# Altium PCB PCB.PcbDoc (part 7 of 8)
Units mm, origin at the board's own origin, x right, y up, seen from the top; angles counter-clockwise.
Board outline 78.8 x 69 mm, 12 copper layers (Top Layer, GND_12, uStrip1, GND_35, Clocks, GND_57, POWER, Slow_Ctrl, GND_810, uStrip2, GND_1012, Bottom Layer), stack 2.926 mm thick; 460 components, 314 nets, 1929 pads, 3409 vias.
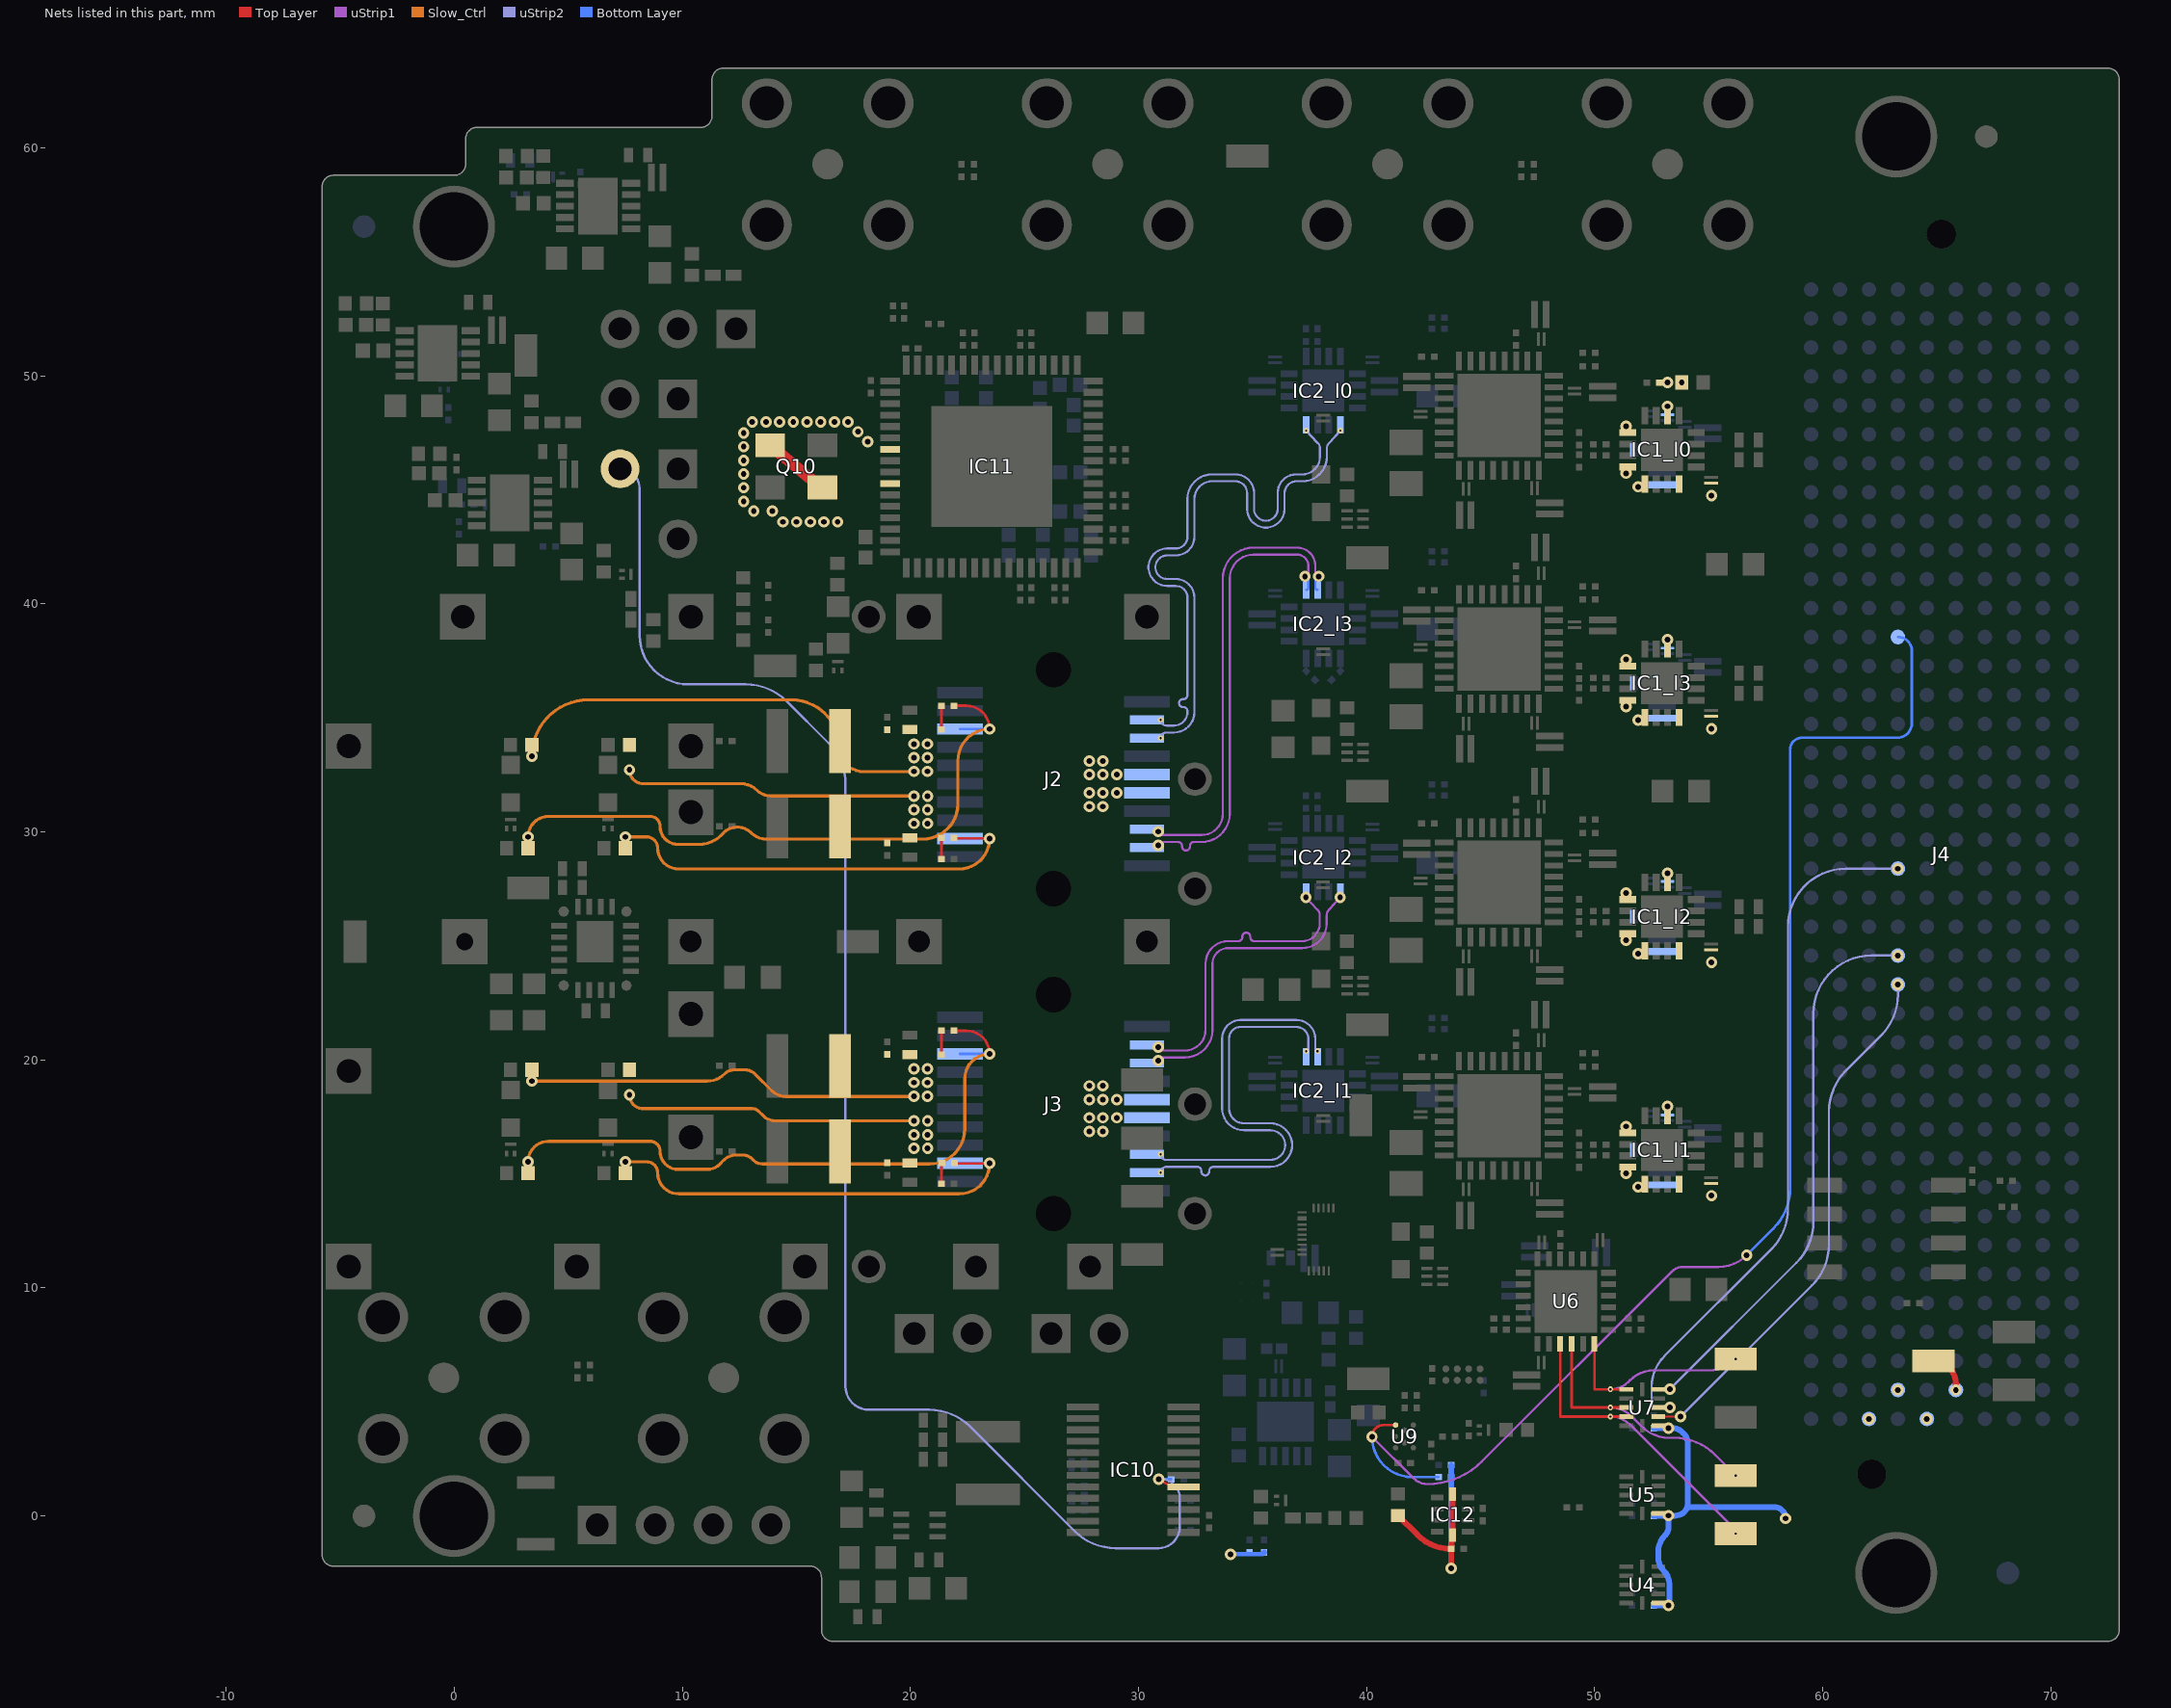
[diagram p16: the nets of this part, all layers, seen from the top]

## Via types
v1: diameter 0.25, hole 0.1, Top Layer to uStrip1, tented both sides, 1130 vias
v2: diameter 0.25, hole 0.1, uStrip2 to Bottom Layer, tented both sides, 686 vias
v3: diameter 0.5, hole 0.25, Top Layer to Bottom Layer, tented both sides, 674 vias
v4: diameter 0.5, hole 0.25, Top Layer to Bottom Layer, 632 vias
v5: diameter 0.5, hole 0.25, uStrip1 to uStrip2, tented both sides, 281 vias
v6: diameter 0.584, hole 0.483, Top Layer to Bottom Layer, tented both sides, 6 vias

## Nets (pads, with @x,y where several pads share a name; then routed paths per layer and width w, separated by ;. In a path a pad name is that pad's centre, name@x,y a point inside that pad or via, vN(x,y) a via of type N, cw(c..) or ccw(c..) an arc to the next point about the centre after c; other vN are vias at no path point) (continued)
SDA_PLL: IC10.17 R60.1 W6.2 | length 69.1
  Top Layer w0.117: v3(30.88,1.611) 31.324,1.369 IC10.17@31.978,1.277
  uStrip2 w0.102: W6.2@7.268,45.925 cw(c7.268,45.067) 8.126,45.067 8.126,38.612 ccw(c10.264,38.612) 10.264,36.475 12.782,36.475 cw(c12.782,33.935) 14.578,35.731 16.406,33.902 cw(c14.61,32.106) 17.15,32.106 17.15,5.69 ccw(c18.182,5.69) 18.182,4.658 20.826,4.658 cw(c20.826,2.118) 22.622,3.914 27.202,-0.666 ccw(c28.998,1.13) 28.998,-1.41 30.874,-1.41 ccw(c30.874,-0.472) 31.811,-0.472 31.811,0.787 ccw(c30.987,0.787) 30.987,1.611 v3(30.88,1.611)
  Bottom Layer w0.117: v3(30.88,1.611) R60.1@31.428,1.611
SDA_PSC: J4.G21 U7.3 | length 30.4
  uStrip2 w0.102: v3(53.298,4.757) 52.705,4.757 cw(c52.705,4.965) 52.498,4.965 52.498,5.661 cw(c54.415,5.659) 53.06,7.015 57.732,11.687 ccw(c55.936,13.483) 58.476,13.483 58.476,25.85 cw(c61.016,25.85) 61.016,28.39 v3(63.298,28.39)
SDA_PSC_3V3: TP16.1 U6.22 U7.9 | length 11.7
  Top Layer w0.117: U6.22@48.992,7.548 48.992,4.757 v1(50.69,4.757) U7.9@51.389,4.757
  uStrip1 w0.102: v1(50.69,4.757) cw(c50.69,3.455) 51.611,4.376 52.051,3.935 ccw(c53.271,5.155) 53.271,3.43 53.481,3.43 cw(c53.481,0.89) 55.277,2.686 v1(56.186,1.777)
SDA_PSF: J4.G13 R83.2 U9.5 | length 59.4
  Top Layer w0.117: v3(40.236,3.477) cw(c40.748,3.477) 40.748,3.99 U9.5@41.271,3.99
  uStrip1 w0.102: v3(40.236,3.477) 42.063,1.65 ccw(c42.665,2.25) 42.665,1.4 ccw(c42.665,4.773) 45.05,2.388 53.379,10.717 cw(c53.884,10.212) 53.884,10.926 55.43,10.926 ccw(c55.43,12.675) 56.665,11.438 ccw(c55.43,12.675) v3(56.666,11.438)
  Bottom Layer w0.117: v3(40.236,3.477) ccw(c42.006,3.477) 42.006,1.707 R83.2@43.153,1.707 ; v3(56.666,11.438) 57.826,12.598 ccw(c56.03,14.395) 58.57,14.395 58.57,33.619 cw(c59.083,33.619) 59.083,34.131 63.269,34.131 ccw(c63.269,34.771) 63.909,34.771 63.909,37.939 ccw(c63.298,37.939) J4.G13@63.298,38.55
SFP0_FAULT: J2.2 R44.1 R46.1 | length 20.4
  Top Layer w0.117: R44.1@21.959,29.738 ccw(c21.982,29.738) 21.982,29.715 v3(23.471,29.715)
  Slow_Ctrl w0.137: v3(7.505,29.785) 8.431,29.785 cw(c8.431,29.302) 8.914,29.302 ccw(c9.841,29.302) 9.841,28.375 22.131,28.375 ccw(c22.131,29.715) v3(23.471,29.715)
  Bottom Layer w0.117: J2.2@22.171,29.715 v3(23.471,29.715)
SFP0_LOS: J2.8 R45.1 R47.1 | length 28.8
  Top Layer w0.117: R45.1@21.904,35.535 22.452,35.535 cw(c22.452,34.515) v3(23.471,34.515)
  Slow_Ctrl w0.137: v3(3.232,29.785) cw(c4.131,29.785) 4.131,30.684 8.582,30.684 cw(c8.582,30.24) 9.025,30.24 ccw(c9.813,30.24) 9.813,29.452 10.717,29.452 ; 10.718,29.452 ccw(c10.718,30.865) 11.717,29.866 cw(c12.407,29.361) 13,29.977 13.005,29.972 ccw(c13.695,30.67) 13.695,29.688 20.54,29.688 ccw(c20.54,31.228) 22.079,31.228 22.079,33.119 cw(c23.475,33.119) v3@23.475,34.515
  Bottom Layer w0.117: J2.8@22.171,34.515 v3(23.471,34.515)
SFP1_FAULT: J3.2 R52.1 R54.1 | length 20.4
  Top Layer w0.117: R52.1@21.959,15.488 ccw(c21.982,15.488) 21.982,15.465 v3(23.471,15.465)
  Slow_Ctrl w0.137: v3(7.505,15.535) 8.431,15.535 cw(c8.431,15.052) 8.914,15.052 ccw(c9.841,15.052) 9.841,14.125 22.131,14.125 ccw(c22.131,15.465) v3(23.471,15.465)
  Bottom Layer w0.117: J3.2@22.171,15.465 v3(23.471,15.465)
SFP1_LOS: J3.8 R53.1 R55.1 | length 28.9
  Top Layer w0.117: R53.1@21.904,21.285 22.452,21.285 cw(c22.452,20.265) v3(23.471,20.265)
  Slow_Ctrl w0.137: v3(3.232,15.535) cw(c4.131,15.535) 4.131,16.434 8.582,16.434 cw(c8.582,15.99) 9.025,15.99 ccw(c9.813,15.99) 9.813,15.202 11.101,15.202 ccw(c11.101,15.953) 11.632,15.422 11.83,15.62 cw(c12.326,15.123) 12.326,15.826 12.676,15.826 cw(c12.676,15.309) 13.041,15.675 ; 13.041,15.674 13.115,15.601 ccw(c13.506,15.992) 13.506,15.438 20.84,15.438 ccw(c20.84,16.978) 22.379,16.978 22.379,19.173 cw(c23.471,19.173) v3(23.471,20.265)
  Bottom Layer w0.117: J3.8@22.171,20.265 v3(23.471,20.265)
SFP_RX0_N: IC2_l0.4 J2.12 | length 24.9
  uStrip2 w0.094: v2(30.972,34.915) ccw(c31.22,34.915) 31.22,34.667 31.557,34.667 ccw(c31.557,35.257) 32.146,35.257 32.146,35.304 ccw(c31.972,35.304) 31.972,35.478 31.949,35.478 cw(c31.949,35.652) 31.949,35.826 31.972,35.826 ccw(c31.972,36) 32.146,36 32.146,36.331 32.146,37.905 32.146,40.273 ccw(c31.629,40.273) 31.629,40.79 31.255,40.79 cw(c31.255,41.611) 31.255,42.433 31.629,42.433 ccw(c31.629,42.95) 32.146,42.95 32.146,44.488 32.146,44.603 cw(c33.227,44.603) 33.227,45.684 33.318,45.684 34.245,45.684 cw(c34.245,44.862) 35.066,44.862 35.066,44.168 ccw(c35.583,44.168) 36.1,44.168 36.1,44.862 cw(c36.922,44.862) 36.922,45.684 37.121,45.684 37.179,45.684 ccw(c37.179,46.46) 37.955,46.46 37.955,46.827 ccw(c37.634,46.827) 37.861,47.053 37.838,47.077 v2(37.35,47.603)
SFP_RX0_P: IC2_l0.1 J2.13 | length 24.9
  uStrip2 w0.094: v2(30.972,34.115) cw(c31.22,34.115) 31.22,34.363 31.557,34.363 ccw(c31.557,35.257) 32.451,35.257 32.451,37.905 32.451,40.273 ccw(c31.629,40.273) 31.629,41.095 31.255,41.095 cw(c31.255,41.611) 31.255,42.128 31.629,42.128 ccw(c31.629,42.95) 32.451,42.95 32.451,44.488 32.451,44.603 cw(c33.227,44.603) 33.227,45.379 33.318,45.379 34.245,45.379 cw(c34.245,44.862) 34.762,44.862 34.762,44.168 ccw(c35.583,44.168) 36.405,44.168 36.405,44.862 cw(c36.922,44.862) 36.922,45.379 37.121,45.379 37.179,45.379 ccw(c37.179,46.46) 38.26,46.46 38.26,46.827 cw(c38.581,46.827) 38.354,47.053 38.377,47.077 v2(38.85,47.603)
SFP_RX1_N: IC2_l2.4 J3.12 | length 13.4
  uStrip1 w0.094: v2(30.866,20.566) ccw(c31.014,20.566) 31.014,20.417 31.437,20.417 32.036,20.417 ccw(c32.036,21.321) 32.94,21.321 32.94,24.227 cw(c33.925,24.227) 33.925,25.213 34.33,25.213 34.377,25.213 ccw(c34.377,25.387) 34.551,25.387 34.551,25.409 cw(c34.725,25.409) 34.899,25.409 34.899,25.387 ccw(c35.073,25.387) 35.073,25.213 35.549,25.213 37.17,25.213 ccw(c37.17,25.989) 37.946,25.989 37.946,26.355 ccw(c37.625,26.355) 37.852,26.582 37.829,26.606 v2(37.341,27.132)
  other v5: 30.866,20.566 37.341,27.132
SFP_RX1_P: IC2_l2.1 J3.13 | length 13.4
  uStrip1 w0.094: v5(30.866,19.964) cw(c31.014,19.964) 31.014,20.113 31.31,20.113 32.036,20.113 ccw(c32.036,21.321) 33.245,21.321 33.245,24.227 cw(c33.925,24.227) 33.925,24.908 37.17,24.908 ccw(c37.17,25.989) 38.251,25.989 38.251,26.355 cw(c38.572,26.355) 38.345,26.582 38.368,26.606 v2(38.841,27.132)
  other v2: 30.866,19.964
  other v5: 38.841,27.132
SFP_TX0_N: IC2_l3.9 J2.19 | length 20.3
  uStrip1 w0.094: v5(30.866,29.414) cw(c31.014,29.414) 31.014,29.563 31.339,29.563 31.734,29.563 cw(c31.734,29.389) 31.908,29.389 31.908,29.361 ccw(c32.082,29.361) 32.256,29.361 32.256,29.389 cw(c32.43,29.389) 32.43,29.563 32.684,29.563 32.77,29.563 ccw(c32.77,30.794) 32.955,29.577 ccw(c32.77,30.794) 34.002,30.794 34.002,41.128 cw(c35.039,41.128) 35.039,42.165 36.955,42.165 cw(c36.955,41.673) 37.447,41.673 37.447,41.358 cw(c37.299,41.358) v5(37.299,41.209)
  Bottom Layer w0.099: v5(37.299,41.209) cw(c37.299,41.061) 37.447,41.061 37.447,40.712 cw(c37.35,40.712) IC2_l3.9@37.35,40.614
  other v2: 30.866,29.414 37.299,41.209
SFP_TX0_P: IC2_l3.10 J2.18 | length 20.3
  uStrip1 w0.094: v2(30.866,30.016) ccw(c31.014,30.016) 31.014,29.867 32.77,29.867 ccw(c32.77,30.794) 33.697,30.794 33.697,41.128 cw(c35.039,41.128) 35.039,42.47 36.955,42.47 cw(c36.955,41.673) 37.752,41.673 37.752,41.358 ccw(c37.901,41.358) v5(37.901,41.209)
  Bottom Layer w0.099: IC2_l3.10@37.85,40.614 cw(c37.85,40.712) 37.752,40.712 37.752,41.061 cw(c37.901,41.061) v5(37.901,41.209)
  other v2: 37.901,41.209
  other v5: 30.866,30.016
SFP_TX1_N: IC2_l1.9 J3.19 | length 18.3
  uStrip2 w0.094: v2(30.972,15.065) cw(c31.22,15.065) 31.22,15.313 32.184,15.313 32.579,15.313 cw(c32.579,15.139) 32.753,15.139 32.753,15.111 ccw(c32.927,15.111) 33.101,15.111 33.101,15.139 cw(c33.275,15.139) 33.275,15.313 33.681,15.313 35.783,15.313 ccw(c35.783,16.265) 36.735,16.265 ccw(c35.778,16.265) 35.778,17.223 34.62,17.223 cw(c34.62,17.87) 33.973,17.87 33.973,20.952 cw(c34.468,20.952) 34.468,21.448 36.92,21.448 cw(c36.92,20.92) 37.447,20.92 37.447,20.486 cw(c37.35,20.486) v2(37.35,20.389)
SFP_TX1_P: IC2_l1.10 J3.18 | length 18.3
  uStrip2 w0.094: v2(30.972,15.865) ccw(c31.22,15.865) 31.22,15.617 35.783,15.617 ccw(c35.783,16.265) 36.431,16.265 ccw(c35.778,16.265) 35.778,16.918 34.62,16.918 cw(c34.62,17.87) 33.668,17.87 33.668,20.952 cw(c34.468,20.952) 34.468,21.752 36.92,21.752 cw(c36.92,20.92) 37.752,20.92 37.752,20.486 ccw(c37.85,20.486) v2(37.85,20.389)
SLOAD_PSC: J4.G24 U7.5 | length 24.1
  uStrip2 w0.102: v3(53.298,5.557) 58.847,11.106 ccw(c57.051,12.902) 59.591,12.902 59.591,22.04 cw(c62.131,22.04) 62.131,24.58 v3(63.298,24.58)
SLOAD_PSC_3V3: TP12.1 U6.24 U7.7 | length 9.2
  Top Layer w0.117: U6.24@49.992,7.548 49.992,5.557 v1(50.69,5.557) U7.7@51.389,5.557
  uStrip1 w0.102: v1(50.69,5.557) 50.699,5.557 ccw(c50.699,6.648) 51.471,5.877 51.544,5.95 cw(c52.596,4.897) 52.596,6.386 54.992,6.386 ccw(c54.992,8.075) v1(56.186,6.881)
SOUT_PSC: J4.G25 U7.2 | length 23.6
  Top Layer w0.089: U7.2@52.789,4.357 v3(53.77,4.357)
  uStrip2 w0.102: v3(53.77,4.357) 59.529,10.116 ccw(c57.733,11.912) 60.273,11.912 60.273,17.735 cw(c62.813,17.735) 61.017,19.531 62.554,21.068 ccw(c60.758,22.864) 63.298,22.864 v3(63.298,23.31)
SOUT_PSC_3V3: TP18.1 U6.21 U7.10 | length 13.7
  Top Layer w0.117: U6.21@48.492,7.548 48.492,4.357 v1(50.69,4.357) U7.10@51.389,4.357
  uStrip1 w0.102: v1(50.69,4.357) cw(c50.69,3.127) 51.56,3.997 56.083,-0.526 cw(c55.834,-0.776) v1(56.186,-0.776)
VADJ: C92.2 C94.2 C142.2 C146.2 IC12.5 IC12.10 J4.E39 J4.F40 J4.G39 J4.H40 R62.2 R63.2 R80.2 R83.1 R84.1 TP10.1 U4.1 U5.1 U7.1 | length 29.6
  Top Layer w0.254: R80.2@41.375,0.024 42.233,-0.835 ccw(c43.711,0.644) C142.2@43.711,-1.447 ; v3(43.703,-2.294) 43.707,-2.29 43.707,-1.451 C142.2@43.711,-1.447 ; IC12.5@43.775,0.958 IC12.10@43.775,-0.842 43.775,-0.992 43.734,-1.033 43.734,-1.437 43.724,-1.447 C142.2@43.711,-1.447 ; TP10.1@64.85,6.794 cw(c64.85,5.807) 65.838,5.807 v3(65.838,5.53)
  Bottom Layer w0.178: v3@34.036,-1.672 35.442,-1.672 ccw(c35.442,-1.617) R62.2@35.497,-1.617
  Bottom Layer w0.254: R62.2@35.497,-1.617 R62.2@35.507,-1.594 ; v3(43.703,-2.294) R83.1@43.703,1.707 R84.1@43.703,2.232 ; C92.2@52.584,-3.919 v3(53.237,-3.919) ccw(c53.153,-3.835) 53.272,-3.835 53.272,-2.978 ccw(c52.486,-2.978) 53.042,-2.422 cw(c53.657,-1.807) 52.787,-1.807 52.787,-1.581 cw(c53.854,-1.581) 53.099,-0.827 ccw(c52.766,-0.494) 53.237,-0.494 v3(53.237,0.018) ; C94.2@52.584,0.018 v3(53.237,0.018) ; C146.2@52.584,3.857 v3(53.237,3.857) ; v3@53.37,3.857 cw(c53.37,3.137) 54.09,3.137 54.09,0.575 cw(c53.532,0.575) 53.532,0.018 v3(53.237,0.018) ; 54.09,0.393 57.872,0.393 cw(c57.872,-0.107) v3(58.372,-0.107)
  other v3: 34.036,-1.684 62.028,4.26 64.568,4.26 63.298,5.53
VccR0: C69.2 C70.2 J2.15 L2.1 R42.2 R45.2 R48.2 | length 21
  Top Layer w0.117: R48.2@21.354,34.487 R45.2@21.354,35.535
  Slow_Ctrl w0.137: v3(3.407,33.322) cw(c5.878,33.322) 5.878,35.794 14.786,35.794 cw(c14.786,33.702) 16.877,33.702 ccw(c17.932,33.702) 17.932,32.648 v4@20.188,32.648
  other v3: 27.842,32.515
  other v4: 28.442,32.515 29.042,32.515 20.152,32.658 20.752,32.658 27.842,33.115 28.442,33.115 20.152,33.258 20.752,33.258 20.152,33.858 20.752,33.858
VccR1: C75.2 C76.2 J3.15 L4.1 R50.2 R53.2 R56.2 | length 18.4
  Top Layer w0.117: R56.2@21.354,20.237 R53.2@21.354,21.285
  Slow_Ctrl w0.137: v3(3.407,19.072) 11.086,19.072 ccw(c11.086,20.158) 11.629,19.218 ccw(c11.086,20.158) 11.854,19.39 cw(c12.284,18.959) 12.284,19.569 12.73,19.569 cw(c12.73,18.9) 13.203,19.373 13.936,18.64 ccw(c14.52,19.225) 14.52,18.398 v4@20.188,18.398
  other v3: 27.842,18.265
  other v4: 28.442,18.265 29.042,18.265 20.152,18.41 20.752,18.41 27.842,18.865 28.442,18.865 20.152,19.01 20.752,19.01 20.152,19.61 20.752,19.61
VccT0: C72.2 C73.2 J2.16 L3.1 R41.2 R43.2 R44.2 | length 13.9
  Top Layer w0.117: R43.2@21.354,28.818 R44.2@21.354,29.738
  Slow_Ctrl w0.137: v3(7.68,32.723) ccw(c8.288,32.723) 8.288,32.115 12.569,32.115 cw(c12.569,31.099) 13.287,31.817 ccw(c13.856,32.386) 13.856,31.582 v4@20.188,31.582
  other v3: 27.842,31.715
  other v4: 20.154,30.372 20.754,30.372 20.154,30.972 20.754,30.972 27.842,31.115 28.442,31.115 20.154,31.572 20.754,31.572 28.442,31.715 29.042,31.715
VccT1: C78.2 C79.2 J3.16 L5.1 R49.2 R51.2 R52.2 | length 13.9
  Top Layer w0.117: R51.2@21.354,14.568 R52.2@21.354,15.488
  Slow_Ctrl w0.137: v3(7.68,18.473) ccw(c8.288,18.473) 8.288,17.865 13.07,17.865 cw(c13.07,17.479) 13.343,17.752 13.551,17.544 ccw(c14.064,18.058) 14.064,17.332 v4@20.188,17.332
  other v3: 27.842,17.465
  other v4: 20.154,16.125 20.754,16.125 20.154,16.725 20.754,16.725 27.842,16.865 28.442,16.865 20.154,17.325 20.754,17.325 28.442,17.465 29.042,17.465
VREFAC: C1_l0.2 C1_l1.2 C1_l2.2 C1_l3.2 C11_l0.2 C11_l1.2 C11_l2.2 C11_l3.2 C23_l0.2 C23_l1.2 C23_l2.2 C23_l3.2 C25_l0.2 C25_l1.2 C25_l2.2 C25_l3.2 IC1_l0.1 IC1_l0.4 IC1_l0.5 IC1_l0.8 IC1_l0.14 IC1_l1.1 IC1_l1.4 IC1_l1.5 IC1_l1.8 IC1_l1.14 IC1_l2.1 IC1_l2.4 IC1_l2.5 IC1_l2.8 IC1_l2.14 IC1_l3.1 IC1_l3.4 IC1_l3.5 IC1_l3.8 IC1_l3.14 R25.1 R27.2
  other v3: 55.124,14.048 51.903,14.429 51.378,15.021 51.378,17.088 53.199,17.959 55.124,24.284 51.903,24.665 51.378,25.257 51.378,27.324 53.199,28.195 55.124,34.521 51.903,34.902 51.378,35.494 51.378,37.561 53.199,38.431 55.124,44.757 51.903,45.138 51.378,45.73 51.378,47.797 53.199,48.668 53.199,49.712 53.818,49.712
XTAL_GND: IC11.7 IC11.10 Q10.2 Q10.4 | length 2.9
  Top Layer w0.508: Q10.2@13.846,46.955 14.175,46.684 15.766,45.376 Q10.4@16.1,45.101
  other v4: 14.408,43.6 15.008,43.6 15.608,43.6 16.208,43.6 16.808,43.6 13.13,44.072 13.95,44.072 12.688,44.497 12.688,45.097 12.688,45.697 12.688,46.297 12.688,46.897 18.129,47.119 12.688,47.497 17.697,47.552 13.064,47.984 13.664,47.984 14.264,47.984 14.864,47.984 15.464,47.984 16.064,47.984 16.664,47.984 17.264,47.984
pads on no net: FTG1.FTG2 FTG2.FTG2 FTG3.FTG2 FTG4.FTG2 IC2_l0.6 IC2_l0.7 IC2_l0.14 IC2_l0.15 IC2_l1.6 IC2_l1.7 IC2_l1.14 IC2_l1.15 IC2_l2.6 IC2_l2.7 IC2_l2.14 IC2_l2.15 IC2_l3.6 IC2_l3.7 IC2_l3.14 IC2_l3.15 IC3_l0.5 IC3_l1.5 IC3_l2.5 IC3_l3.5 IC10.19 IC10.20 IC11.5 IC11.11 IC11.12 IC11.14 IC11.15 IC11.20 IC11.21 IC11.22 IC11.23 IC11.24 IC11.25 IC11.39 IC11.43 IC11.44 IC11.45 IC11.48 IC11.55 IC11.56 IC12.4 IC12.6 IC12.9 ICx1.11 J2.7 J2.9 J2.MTG1 J2.MTG2 J3.7 J3.9 J3.MTG1 J3.MTG2 J4. J4._1 J4.A6 J4.A7 J4.A10 J4.A11 J4.A14 J4.A15 J4.A18 J4.A19 J4.A26 J4.A27 J4.A30 J4.A31 J4.A34 J4.A35 J4.A38 J4.A39 J4.B1 J4.B4 J4.B5 J4.B8 J4.B9 J4.B12 J4.B13 J4.B16 J4.B17 J4.B24 J4.B25 J4.B28 J4.B29 J4.B32 J4.B33 J4.B36 J4.B37 J4.B40 J4.C10 J4.C11 J4.C26 J4.C27 J4.D1 J4.D14 J4.D15 J4.D20 J4.D21 J4.D27 J4.D29 J4.D33 J4.D34 J4.E2 J4.E3 J4.E6 J4.E7 J4.E9 J4.E10 J4.E12 J4.E13 J4.E15 J4.E16 J4.E18 J4.E19 J4.E21 J4.E22 J4.E24 J4.E25 J4.E27 J4.E28 J4.E30 J4.E31 J4.E33 J4.E34 J4.E36 J4.E37 J4.F1 J4.F4 J4.F5 J4.F7 J4.F8 J4.F10 J4.F11 J4.F13 J4.F14 J4.F16 J4.F17 J4.F19 J4.F20 J4.F22 J4.F23 J4.F25 J4.F26 J4.F28 J4.F29 J4.F31 J4.F32 J4.F34 J4.F35 J4.F37 J4.F38 J4.G2 J4.G3 J4.G27 J4.G28 J4.G30 J4.G31 J4.G33 J4.G34 J4.G36 J4.G37 J4.H1 J4.H2 J4.H16 J4.H17 J4.H22 J4.H23 J4.H28 J4.H29 J4.H31 J4.H32 J4.H34 J4.H35 J4.H37 J4.H38 J4.I2 J4.I3 J4.I6 J4.I7 J4.I9 J4.I10 J4.I12 J4.I13 J4.I15 J4.I16 J4.I18 J4.I19 J4.I21 J4.I22 J4.I24 J4.I25 J4.I27 J4.I28 J4.I30 J4.I31 J4.I33 J4.I34 J4.I36 J4.I37 J4.I39 J4.J1 J4.J4 J4.J5 J4.J7 J4.J8 J4.J10 J4.J11 J4.J13 J4.J14 J4.J16 J4.J17 J4.J19 J4.J20 J4.J22 J4.J23 J4.J25 J4.J26 J4.J28 J4.J29 J4.J31 J4.J32 J4.J34 J4.J35 J4.J37 J4.J38 J4.J40 U1_l0.11 U1_l0.28 U1_l0.29 U1_l1.11 U1_l1.28 U1_l1.29 U1_l2.11 U1_l2.28 U1_l2.29 U1_l3.11 U1_l3.28 U1_l3.29 U3.7 U6.4 U6.5 U6.6 U6.13 U6.14

## Polygon pours and split planes (outlines as drawn)
GND on Top Layer "GND_TOP_LAYER_P1071" (solid, remove dead copper, pour order 1071): -5.8,63.5 73,63.5 73,-5.5 -5.8,-5.5
3V3CDR on Top Layer "3V3CDR_TOP_LAYER_P1070" (solid, pour order 1070): 49.881,20.434 50.948,20.434 50.948,18.672 47.797,18.672 47.797,18.926 48.61,18.926 49.881,19.576
3V3CDR on Top Layer "3V3CDR_TOP_LAYER_P973" (solid, remove dead copper, pour order 973): 47.326,51.134 47.174,50.246 46.926,50.253 46.878,51.444 47.212,53.301 47.512,53.301 47.612,51.88 47.612,51.28
3V3CDR on Top Layer "3V3CDR_TOP_LAYER_P1069" (solid, remove dead copper, pour order 1069): 43.809,18.926 41.595,18.926 41.595,17.811 41.85,17.672 43.809,17.672 43.809,17.926 42.811,17.926 42.811,18.672 43.809,18.672
3V3CDR on Top Layer "3V3CDR_TOP_LAYER_P1068" (solid, pour order 1068): 49.881,30.671 50.948,30.671 50.948,28.908 47.797,28.908 47.797,29.162 48.61,29.162 49.881,29.812
3V3CDR on Top Layer "3V3CDR_TOP_LAYER_P1067" (solid, remove dead copper, pour order 1067): 43.809,29.162 41.595,29.162 41.595,28.048 41.85,27.908 43.809,27.908 43.809,28.162 42.811,28.162 42.811,28.908 43.809,28.908
3V3CDR on Top Layer "3V3CDR_TOP_LAYER_P1066" (solid, pour order 1066): 49.881,40.907 50.948,40.907 50.948,39.144 47.797,39.144 47.797,39.398 48.61,39.398 49.881,40.049
3V3CDR on Top Layer "3V3CDR_TOP_LAYER_P1065" (solid, remove dead copper, pour order 1065): 43.809,39.398 41.595,39.398 41.595,38.284 41.85,38.144 43.809,38.144 43.809,38.398 42.811,38.398 42.811,39.144 43.809,39.144
VccR0 on Top Layer "VCCR0_TOP_LAYER_P963" (solid, remove dead copper, pour order 963): 15.293,35.592 17.738,35.592 18.753,34.712 21.397,34.712 21.397,32.388 15.293,32.388
3V3APLL on Top Layer "3V3APLL_TOP_LAYER_P1051" (solid, remove dead copper, pour order 1051): 0.318,51.137 1.118,51.137 4.31,51.137 4.31,48.832 0.318,48.832
1V8 on Top Layer "1V8_TOP_LAYER_P1064" (solid, remove dead copper, pour order 1064): 53.549,47.889 54.074,47.364 54.82,47.364 55.467,48.037 55.467,48.387 55.264,48.759 54.928,48.882 53.549,48.882
1V8 on Top Layer "1V8_TOP_LAYER_P1063" (solid, remove dead copper, pour order 1063): 53.549,37.652 54.074,37.127 54.82,37.127 55.467,37.8 55.467,38.15 55.264,38.523 54.928,38.645 53.549,38.645
1V8 on Top Layer "1V8_TOP_LAYER_P1062" (solid, remove dead copper, pour order 1062): 53.549,17.179 54.074,16.654 54.82,16.654 55.467,17.328 55.467,17.677 55.264,18.05 54.928,18.172 53.549,18.172
1V8 on Top Layer "1V8_TOP_LAYER_P1061" (solid, remove dead copper, pour order 1061): 53.549,27.416 54.074,26.891 54.82,26.891 55.467,27.564 55.467,27.914 55.264,28.286 54.928,28.409 53.549,28.409
VREFAC on Top Layer "VREFAC_TOP_LAYER_P1060" (solid, remove dead copper, pour order 1060): 51.074,46.159 51.074,45.446 51.483,45.446 51.824,45.859 51.824,46.159
VREFAC on Top Layer "VREFAC_TOP_LAYER_P1059" (solid, remove dead copper, pour order 1059): 51.074,35.923 51.074,35.21 51.483,35.21 51.824,35.623 51.824,35.923
VREFAC on Top Layer "VREFAC_TOP_LAYER_P1058" (solid, remove dead copper, pour order 1058): 51.074,25.686 51.074,24.973 51.483,24.973 51.824,25.386 51.824,25.686
VREFAC on Top Layer "VREFAC_TOP_LAYER_P1041" (solid, remove dead copper, pour order 1041): 51.074,15.454 51.074,14.741 51.483,14.741 51.824,15.154 51.824,15.454
P2V05 on Top Layer "P2V05_TOP_LAYER_P1048" (solid, remove dead copper, pour order 1048): 2.164,24.76 2.164,28.716 5.047,28.716 5.047,24.76
P3V3 on Top Layer "P3V3_TOP_LAYER_P1057" (solid, remove dead copper, pour order 1057): 8.289,23.072 8.047,23.515 6.297,23.515 6.297,20.585 8.909,20.585 8.909,23.072
P3V3A on Top Layer "P3V3A_TOP_LAYER_P1056" (solid, remove dead copper, pour order 1056): 64.74,14.843 67.997,14.843 67.997,13.428 64.74,13.428
NetC41_1 on Top Layer "NETC41_1_TOP_LAYER_P959" (solid, remove dead copper, pour order 959): 20.839,-0.7 24.782,-0.7 24.782,2.227 22.394,2.227 21.607,-0.134 20.839,-0.134
P12V on Top Layer "P12V_TOP_LAYER_P958" (solid, remove dead copper, pour order 958): 24.394,-0.805 20.839,-0.805 20.834,-2.164 20.839,-4.614 24.394,-4.614
P3V6 on Top Layer "P3V6_TOP_LAYER_P1053" (solid, remove dead copper, pour order 1053): 5.277,57.104 2.011,57.104 2.011,54.213 5.277,54.213
P2V05 on Top Layer "P2V05_TOP_LAYER_P1055" (solid, remove dead copper, pour order 1055): 1.384,44.076 -1.882,44.076 -1.882,41.185 1.384,41.185
P3V6 on Top Layer "P3V6_TOP_LAYER_P1054" (solid, remove dead copper, pour order 1054): -1.782,50.633 -5.048,50.633 -5.048,47.742 -1.782,47.742
3V3CDR on Top Layer "3V3CDR_TOP_LAYER_P1050" (solid, remove dead copper, pour order 1050): 7.351,57.599 8.151,57.599 11.343,57.599 11.343,55.294 7.351,55.294
1V8 on Top Layer "1V8_TOP_LAYER_P1052" (solid, remove dead copper, pour order 1052): 3.484,44.58 4.284,44.58 7.476,44.58 7.476,42.276 3.484,42.276
P3V3 on Top Layer "P3V3_TOP_LAYER_P961" (solid, remove dead copper, pour order 961): 15.485,35.592 11.903,35.592 11.904,32.388 15.485,32.388
VccT0 on Top Layer "VCCT0_TOP_LAYER_P964" (solid, remove dead copper, pour order 964): 15.485,28.638 17.931,28.638 18.753,29.513 21.399,29.513 21.399,31.842 15.485,31.842
P3V3 on Top Layer "P3V3_TOP_LAYER_P962" (solid, remove dead copper, pour order 962): 15.485,31.838 11.903,31.838 11.904,28.634 15.485,28.634
VccR1 on Top Layer "VCCR1_TOP_LAYER_P969" (solid, remove dead copper, pour order 969): 15.293,21.344 17.738,21.344 18.753,20.464 21.397,20.464 21.397,18.14 15.293,18.14
P3V3 on Top Layer "P3V3_TOP_LAYER_P965" (solid, remove dead copper, pour order 965): 15.485,21.342 11.903,21.342 11.904,18.138 15.485,18.138
VccT1 on Top Layer "VCCT1_TOP_LAYER_P971" (solid, remove dead copper, pour order 971): 15.485,14.391 17.931,14.391 18.753,15.265 21.398,15.265 21.398,17.594 15.485,17.594
P3V3 on Top Layer "P3V3_TOP_LAYER_P966" (solid, remove dead copper, pour order 966): 15.485,17.588 11.903,17.588 11.904,14.384 15.485,14.384
P3V6 on Top Layer "P3V6_TOP_LAYER_P960" (solid, remove dead copper, pour order 960): 24.782,2.227 24.782,6.312 21.074,6.312 21.074,2.916 21.361,2.68 21.361,2.23
VREFAC on Top Layer "VREFAC_TOP_LAYER_P1046" (solid, remove dead copper, pour order 1046): 53.549,14.664 55.415,14.664 55.415,13.785 54.333,13.785 53.549,14.179
VREFAC on Top Layer "VREFAC_TOP_LAYER_P1045" (solid, remove dead copper, pour order 1045): 52.349,14.179 51.648,14.179 51.648,14.529 52.049,14.929 52.349,14.929
1V8 on Top Layer "1V8_TOP_LAYER_P1044" (solid, remove dead copper, pour order 1044): 52.049,17.179 52.849,17.179 52.849,17.929 52.607,18.232 52.291,18.232 52.049,17.929
VREFAC on Top Layer "VREFAC_TOP_LAYER_P1043" (solid, remove dead copper, pour order 1043): 51.074,16.654 51.074,17.368 51.677,17.368 51.824,16.954 51.824,16.654
VREFAC on Top Layer "VREFAC_TOP_LAYER_P1039" (solid, remove dead copper, pour order 1039): 53.549,24.901 55.415,24.901 55.415,24.021 54.333,24.021 53.549,24.416
VREFAC on Top Layer "VREFAC_TOP_LAYER_P1037" (solid, remove dead copper, pour order 1037): 52.349,24.416 51.648,24.416 51.648,24.765 52.049,25.166 52.349,25.166
1V8 on Top Layer "1V8_TOP_LAYER_P1035" (solid, remove dead copper, pour order 1035): 52.049,27.416 52.849,27.416 52.849,28.166 52.607,28.468 52.291,28.468 52.049,28.166
VREFAC on Top Layer "VREFAC_TOP_LAYER_P1033" (solid, remove dead copper, pour order 1033): 51.074,26.891 51.074,27.604 51.677,27.604 51.824,27.191 51.824,26.891
VREFAC on Top Layer "VREFAC_TOP_LAYER_P1031" (solid, remove dead copper, pour order 1031): 53.549,35.137 55.415,35.137 55.415,34.258 54.333,34.258 53.549,34.652
VREFAC on Top Layer "VREFAC_TOP_LAYER_P1028" (solid, remove dead copper, pour order 1028): 52.349,34.652 51.648,34.652 51.648,35.001 52.049,35.402 52.349,35.402
1V8 on Top Layer "1V8_TOP_LAYER_P1027" (solid, remove dead copper, pour order 1027): 52.049,37.652 52.849,37.652 52.849,38.402 52.607,38.704 52.291,38.704 52.049,38.402
VREFAC on Top Layer "VREFAC_TOP_LAYER_P1026" (solid, remove dead copper, pour order 1026): 51.074,37.127 51.074,37.84 51.677,37.84 51.824,37.427 51.824,37.127
3V3CDR on Top Layer "3V3CDR_TOP_LAYER_P1023" (solid, remove dead copper, pour order 1023): 47.619,7.878 47.619,5.935 46.656,5.935 46.411,5.935 46.411,6.335 47.365,7.878
3V3CDR on Top Layer "3V3CDR_TOP_LAYER_P1021" (solid, remove dead copper, pour order 1021): 47.619,12.294 47.619,10.952 47.115,10.952 47.115,12.294
VREFAC on Top Layer "VREFAC_TOP_LAYER_P1013" (solid, remove dead copper, pour order 1013): 53.549,45.374 55.415,45.374 55.415,44.494 54.333,44.494 53.549,44.889
VREFAC on Top Layer "VREFAC_TOP_LAYER_P1011" (solid, remove dead copper, pour order 1011): 52.349,44.889 51.648,44.889 51.648,45.238 52.049,45.639 52.349,45.639
1V8 on Top Layer "1V8_TOP_LAYER_P1010" (solid, remove dead copper, pour order 1010): 52.049,47.889 52.849,47.889 52.849,48.639 52.607,48.941 52.291,48.941 52.049,48.639
VREFAC on Top Layer "VREFAC_TOP_LAYER_P1008" (solid, remove dead copper, pour order 1008): 51.074,47.364 51.074,48.077 51.677,48.077 51.824,47.664 51.824,47.364
3V3CDR on Top Layer "3V3CDR_TOP_LAYER_P1005" (solid, remove dead copper, pour order 1005): 44.426,36.029 44.426,33.057 45.18,33.057 45.18,33.845 44.68,35.216 44.68,36.029
3V3CDR on Top Layer "3V3CDR_TOP_LAYER_P1001" (solid, remove dead copper, pour order 1001): 47.426,36.029 47.426,34.045 48.631,34.045 48.631,34.345 47.68,36.029
3V3CDR on Top Layer "3V3CDR_TOP_LAYER_P1000" (solid, remove dead copper, pour order 1000): 47.326,40.898 47.174,40.01 46.926,40.017 46.878,41.208 47.212,43.065 47.512,43.065 47.612,41.643 47.612,41.043
3V3CDR on Top Layer "3V3CDR_TOP_LAYER_P998" (solid, remove dead copper, pour order 998): 44.426,25.793 44.426,22.82 45.18,22.82 45.18,23.609 44.68,24.98 44.68,25.793
3V3CDR on Top Layer "3V3CDR_TOP_LAYER_P994" (solid, remove dead copper, pour order 994): 47.426,25.793 47.426,23.809 48.631,23.809 48.631,24.109 47.68,25.793
3V3CDR on Top Layer "3V3CDR_TOP_LAYER_P992" (solid, remove dead copper, pour order 992): 47.326,30.661 47.174,29.773 46.926,29.78 46.878,30.971 47.212,32.828 47.512,32.828 47.612,31.407 47.612,30.807
3V3CDR on Top Layer "3V3CDR_TOP_LAYER_P990" (solid, remove dead copper, pour order 990): 44.426,46.265 44.426,43.293 45.18,43.293 45.18,44.082 44.68,45.453 44.68,46.265
3V3CDR on Top Layer "3V3CDR_TOP_LAYER_P986" (solid, remove dead copper, pour order 986): 44.426,15.556 44.426,12.584 45.18,12.584 45.18,13.373 44.68,14.743 44.68,15.556
3V3CDR on Top Layer "3V3CDR_TOP_LAYER_P984" (solid, remove dead copper, pour order 984): 47.426,15.556 47.426,13.573 48.631,13.573 48.631,13.873 47.68,15.556
3V3CDR on Top Layer "3V3CDR_TOP_LAYER_P982" (solid, remove dead copper, pour order 982): 47.326,20.425 47.174,19.537 46.926,19.544 46.878,20.735 47.212,22.592 47.512,22.592 47.612,21.171 47.612,20.571
3V3CDR on Top Layer "3V3CDR_TOP_LAYER_P980" (solid, pour order 980): 49.881,51.145 50.948,51.145 50.948,49.382 47.797,49.382 47.797,49.636 48.61,49.636 49.881,50.287
3V3CDR on Top Layer "3V3CDR_TOP_LAYER_P978" (solid, remove dead copper, pour order 978): 43.809,49.636 41.595,49.636 41.595,48.522 41.85,48.382 43.809,48.382 43.809,48.636 42.811,48.636 42.811,49.382 43.809,49.382
3V3CDR on Top Layer "3V3CDR_TOP_LAYER_P976" (solid, remove dead copper, pour order 976): 47.426,46.265 47.426,44.282 48.631,44.282 48.631,44.582 47.68,46.265
XTAL_GND on Top Layer "XTAL_GND_TOP_LAYER_P968" (solid, remove dead copper, pour order 968): 19.533,45.13 19.533,45.43 18.483,45.43 16.909,43.856 14.713,43.856 14.242,44.326 12.942,44.326 12.942,43.818 13.51,43.594 14.205,43.348 16.901,43.348 18.683,45.13
XTAL_GND on Top Layer "XTAL_GND_TOP_LAYER_P967" (solid, remove dead copper, pour order 967): 17 vertices, not listed, extent 12.434,43.818 19.533,48.238
GND on Bottom Layer "GND_BOTTOM_LAYER_P1042" (solid, remove dead copper, pour order 1042): 73,63.5 -5.8,63.5 -5.8,-5.5 73,-5.5
1V8 on Bottom Layer "1V8_BOTTOM_LAYER_P972" (solid, remove dead copper, pour order 972): 39.225,19.241 39.225,19.935 41.378,19.935 41.378,18.942 40.195,18.942 40.195,19.141
1V8 on Bottom Layer "1V8_BOTTOM_LAYER_P1040" (solid, remove dead copper, pour order 1040): 53.644,17.238 54.27,17.238 54.366,17.208 54.366,16.877 55.566,16.877 55.566,17.208 55.356,17.779 55.043,18.164 54.811,18.164 53.644,17.372
1V8 on Bottom Layer "1V8_BOTTOM_LAYER_P1038" (solid, remove dead copper, pour order 1038): 53.644,27.475 54.27,27.475 54.366,27.445 54.366,27.113 55.566,27.113 55.566,27.445 55.356,28.016 55.043,28.401 54.811,28.401 53.644,27.608
1V8 on Bottom Layer "1V8_BOTTOM_LAYER_P1036" (solid, remove dead copper, pour order 1036): 53.644,37.711 54.27,37.711 54.366,37.681 54.366,37.349 55.566,37.349 55.566,37.681 55.356,38.252 55.043,38.637 54.811,38.637 53.644,37.845
VccR0 on Bottom Layer "VCCR0_BOTTOM_LAYER_P1034" (solid, remove dead copper, pour order 1034): 27.578,32.265 31.371,32.265 31.371,32.762 29.32,32.762 28.571,33.362 27.578,33.362
VccT0 on Bottom Layer "VCCT0_BOTTOM_LAYER_P1032" (solid, remove dead copper, pour order 1032): 27.578,31.965 31.371,31.965 31.371,31.468 29.32,31.468 28.571,30.868 27.578,30.868
VccR1 on Bottom Layer "VCCR1_BOTTOM_LAYER_P1030" (solid, remove dead copper, pour order 1030): 27.578,18.015 31.371,18.015 31.371,18.512 29.32,18.512 28.571,19.112 27.578,19.112
VccT1 on Bottom Layer "VCCT1_BOTTOM_LAYER_P1029" (solid, remove dead copper, pour order 1029): 27.578,17.715 31.371,17.715 31.371,17.218 29.32,17.218 28.571,16.618 27.578,16.618
NetC66_2 on Bottom Layer "Top Layer-NetC35_2" (solid, remove dead copper, pour order 995): 33.703,6.491 33.703,7.805 35.763,7.805 35.868,7.561 36.088,6.882 36.088,5.234 35.788,5.234 35.788,6.207
1V8 on Bottom Layer "1V8_BOTTOM_LAYER_P1025" (solid, remove dead copper, pour order 1025): 52.137,17.711 52.736,17.711 52.736,18.29 52.137,18.29
VREFAC on Bottom Layer "VREFAC_BOTTOM_LAYER_P1024" (solid, remove dead copper, pour order 1024): 52.9,17.592 53.498,17.592 53.498,18.286 52.9,18.286
1V8 on Bottom Layer "1V8_BOTTOM_LAYER_P1022" (solid, remove dead copper, pour order 1022): 52.136,48.409 52.736,48.409 52.736,48.999 52.136,48.999
VREFAC on Bottom Layer "VREFAC_BOTTOM_LAYER_P1020" (solid, remove dead copper, pour order 1020): 52.9,48.301 53.498,48.301 53.498,49.986 52.9,49.986
1V8 on Bottom Layer "1V8_BOTTOM_LAYER_P1018" (solid, remove dead copper, pour order 1018): 52.137,38.18 52.736,38.18 52.736,38.763 52.137,38.763
VREFAC on Bottom Layer "VREFAC_BOTTOM_LAYER_P1016" (solid, remove dead copper, pour order 1016): 52.9,38.065 53.498,38.065 53.498,38.759 52.9,38.759
1V8 on Bottom Layer "1V8_BOTTOM_LAYER_P1014" (solid, remove dead copper, pour order 1014): 52.137,27.919 52.736,27.919 52.736,28.527 52.137,28.527
VREFAC on Bottom Layer "VREFAC_BOTTOM_LAYER_P1012" (solid, remove dead copper, pour order 1012): 54.259,13.785 53.829,14.177 51.079,14.177 51.078,14.677 55.386,14.677 55.386,13.785
VREFAC on Bottom Layer "VREFAC_BOTTOM_LAYER_P1009" (solid, remove dead copper, pour order 1009): 51.078,14.177 51.677,14.177 51.677,17.553 51.078,17.553
VREFAC on Bottom Layer "VREFAC_BOTTOM_LAYER_P1007" (solid, remove dead copper, pour order 1007): 54.259,24.021 53.829,24.413 51.079,24.413 51.078,24.913 55.386,24.913 55.386,24.021
VREFAC on Bottom Layer "VREFAC_BOTTOM_LAYER_P1006" (solid, remove dead copper, pour order 1006): 52.9,27.829 53.498,27.829 53.498,28.522 52.9,28.522
VREFAC on Bottom Layer "VREFAC_BOTTOM_LAYER_P1004" (solid, remove dead copper, pour order 1004): 51.078,24.413 51.677,24.413 51.677,27.789 51.078,27.789
VREFAC on Bottom Layer "VREFAC_BOTTOM_LAYER_P1002" (solid, remove dead copper, pour order 1002): 54.259,34.258 53.829,34.65 51.079,34.65 51.078,35.15 55.386,35.15 55.386,34.258
VREFAC on Bottom Layer "VREFAC_BOTTOM_LAYER_P999" (solid, remove dead copper, pour order 999): 51.078,34.65 51.677,34.65 51.677,38.025 51.078,38.025
P3V3 on Bottom Layer "Top Layer-Pmain" (solid, remove dead copper, pour order 997): 36.288,0.926 36.288,3.034 39.693,3.034 39.693,0.926
1VPSF on Bottom Layer "VDDIO_LDO_OUT" (solid, remove dead copper, pour order 993): 40.994,7.355 37.6,7.355 36.788,6.034 36.788,5.238 40.994,5.238
VREFAC on Bottom Layer "VREFAC_BOTTOM_LAYER_P991" (solid, remove dead copper, pour order 991): 54.259,44.494 53.829,44.886 51.079,44.886 51.078,45.386 55.386,45.386 55.386,44.494
1V8 on Bottom Layer "1V8_BOTTOM_LAYER_P989" (solid, remove dead copper, pour order 989): 53.644,47.947 54.27,47.947 54.366,47.917 54.366,47.586 55.566,47.586 55.566,47.917 55.356,48.488 55.043,48.873 54.811,48.873 53.644,48.081
VREFAC on Bottom Layer "VREFAC_BOTTOM_LAYER_P987" (solid, remove dead copper, pour order 987): 51.078,44.886 51.677,44.886 51.677,48.262 51.078,48.262
1V8 on Bottom Layer "1V8_BOTTOM_LAYER_P985" (solid, remove dead copper, pour order 985): 36.975,49.949 36.975,50.642 34.822,50.642 34.822,49.649 36.005,49.649 36.005,49.849
1V8 on Bottom Layer "1V8_BOTTOM_LAYER_P983" (solid, remove dead copper, pour order 983): 39.225,49.949 39.225,50.642 41.377,50.642 41.377,49.649 40.195,49.649 40.195,49.849
1V8 on Bottom Layer "1V8_BOTTOM_LAYER_P981" (solid, remove dead copper, pour order 981): 39.225,39.714 39.225,40.408 41.378,40.408 41.378,39.414 40.195,39.414 40.195,39.614
1V8 on Bottom Layer "1V8_BOTTOM_LAYER_P979" (solid, remove dead copper, pour order 979): 36.975,39.714 36.975,40.408 34.822,40.408 34.822,39.414 36.005,39.414 36.005,39.614
1V8 on Bottom Layer "1V8_BOTTOM_LAYER_P977" (solid, remove dead copper, pour order 977): 36.975,29.478 36.975,30.172 34.822,30.172 34.822,29.178 36.005,29.178 36.005,29.378
1V8 on Bottom Layer "1V8_BOTTOM_LAYER_P975" (solid, remove dead copper, pour order 975): 39.225,29.478 39.225,30.172 41.378,30.172 41.378,29.178 40.195,29.178 40.195,29.378
1V8 on Bottom Layer "1V8_BOTTOM_LAYER_P957" (solid, remove dead copper, pour order 957): 36.975,19.241 36.975,19.935 34.822,19.935 34.822,18.942 36.005,18.942 36.005,19.141
GND on Clocks "GND_CLOCKS_P970" (solid, remove dead copper, pour order 970): 73,63.5 -5.8,63.5 -5.8,-5.5 73,-5.5
GND on uStrip1 "GND_USTRIP1_P974" (solid, remove dead copper, pour order 974): 73,63.5 -5.8,63.5 -5.8,-5.5 72.878,-5.5
GND on Slow_Ctrl "GND_SLOW_CTRL_P1047" (solid, remove dead copper, pour order 1047): 73,63.5 -5.8,63.5 -5.8,-5.5 73,-5.5
GND on uStrip2 "GND_USTRIP2_P1049" (solid, remove dead copper, pour order 1049): 73,63.5 -5.8,63.5 -5.8,-5.5 72.878,-5.5
GND on GND_12 (split plane): -5.794,-1.798 -5.776,-1.857 -5.8,-1.799 -5.8,-1.738
GND on GND_12 (split plane): -5.719,-1.98 -5.68,-2.027 -5.724,-1.983 -5.748,-1.926
GND on GND_12 (split plane): -5.794,58.398 -5.8,58.338 -5.8,58.399 -5.776,58.457
GND on GND_12 (split plane): -5.719,58.58 -5.748,58.526 -5.724,58.583 -5.68,58.627
GND on GND_12 (split plane): -5.58,-2.119 -5.526,-2.148 -5.583,-2.124 -5.627,-2.08
GND on GND_12 (split plane): -5.398,-2.194 -5.338,-2.2 -5.399,-2.2 -5.457,-2.176
GND on GND_12 (split plane): 143 vertices, not listed, extent -5.799,-5.499 72.999,63.499
GND on GND_12 (split plane): -5.58,58.719 -5.627,58.68 -5.583,58.724 -5.526,58.748
GND on GND_12 (split plane): -5.338,58.8 -5.398,58.794 -5.457,58.776 -5.399,58.8
GND on GND_12 (split plane): 0.191,58.839 0.111,58.815 0.265,58.879
GND on GND_12 (split plane): 0.353,58.947 0.288,58.894 0.406,59.012
GND on GND_12 (split plane): 0.461,59.109 0.421,59.035 0.485,59.189
GND on GND_12 (split plane): 0.506,60.498 0.5,60.438 0.5,60.499 0.524,60.557
GND on GND_12 (split plane): 0.581,60.68 0.552,60.626 0.576,60.683 0.62,60.727
GND on GND_12 (split plane): 0.72,60.819 0.673,60.78 0.717,60.824 0.774,60.848
GND on GND_12 (split plane): 0.902,60.894 0.843,60.876 0.901,60.9 0.962,60.9
GND on GND_12 (split plane): 10.991,60.939 10.911,60.915 11.065,60.979
GND on GND_12 (split plane): 11.153,61.047 11.088,60.994 11.206,61.112
GND on GND_12 (split plane): 11.261,61.209 11.221,61.135 11.285,61.289
GND on GND_12 (split plane): 16.181,-5.28 16.22,-5.327 16.176,-5.283 16.152,-5.226
GND on GND_12 (split plane): 16.32,-5.419 16.374,-5.448 16.317,-5.424 16.273,-5.38
GND on GND_12 (split plane): 15.953,-2.347 16.006,-2.412 15.888,-2.294
GND on GND_12 (split plane): 16.106,-5.098 16.124,-5.157 16.1,-5.099 16.1,-5.038
GND on GND_12 (split plane): 16.061,-2.509 16.085,-2.589 16.021,-2.435
GND on GND_12 (split plane): 16.502,-5.494 16.562,-5.5 16.501,-5.5 16.443,-5.476
GND on GND_12 (split plane): 72.599,-5.5 72.538,-5.5 72.598,-5.494 72.657,-5.476
GND on GND_12 (split plane): 72.783,-5.424 72.726,-5.448 72.78,-5.419 72.827,-5.38
GND on GND_12 (split plane): 72.924,-5.283 72.88,-5.327 72.919,-5.28 72.948,-5.226
GND on GND_12 (split plane): 73,-5.099 72.976,-5.157 72.994,-5.098 73,-5.038
GND on GND_12 (split plane): 11.306,63.098 11.3,63.038 11.3,63.099 11.324,63.157
GND on GND_12 (split plane): 15.791,-2.239 15.865,-2.279 15.711,-2.215
GND on GND_12 (split plane): 11.381,63.28 11.352,63.226 11.376,63.283 11.42,63.327
GND on GND_12 (split plane): 11.52,63.419 11.473,63.38 11.517,63.424 11.574,63.448
GND on GND_12 (split plane): 11.702,63.494 11.643,63.476 11.701,63.5 11.762,63.5
XTAL_GND on GND_12 (split plane): 19.661,46.968 19.661,44.962 17.892,43.193 13.397,43.193 12.313,44.276 12.313,47.819 12.826,48.331 18.298,48.331
GND on GND_12 (split plane): 73,63.099 73,63.038 72.994,63.098 72.976,63.157
GND on GND_12 (split plane): 72.657,63.476 72.598,63.494 72.538,63.5 72.599,63.5
GND on GND_12 (split plane): 72.924,63.283 72.948,63.226 72.919,63.28 72.88,63.327
GND on GND_12 (split plane): 72.783,63.424 72.827,63.38 72.78,63.419 72.726,63.448
GND on GND_35 (split plane): -5.794,-1.798 -5.776,-1.857 -5.8,-1.799 -5.8,-1.738
GND on GND_35 (split plane): -5.719,-1.98 -5.68,-2.027 -5.724,-1.983 -5.748,-1.926
GND on GND_35 (split plane): -5.794,58.398 -5.8,58.338 -5.8,58.399 -5.776,58.457
GND on GND_35 (split plane): -5.719,58.58 -5.748,58.526 -5.724,58.583 -5.68,58.627
GND on GND_35 (split plane): -5.58,-2.119 -5.526,-2.148 -5.583,-2.124 -5.627,-2.08
GND on GND_35 (split plane): -5.398,-2.194 -5.338,-2.2 -5.399,-2.2 -5.457,-2.176
GND on GND_35 (split plane): 143 vertices, not listed, extent -5.799,-5.499 72.999,63.499
GND on GND_35 (split plane): -5.58,58.719 -5.627,58.68 -5.583,58.724 -5.526,58.748
GND on GND_35 (split plane): -5.338,58.8 -5.398,58.794 -5.457,58.776 -5.399,58.8
GND on GND_35 (split plane): 0.191,58.839 0.111,58.815 0.265,58.879
GND on GND_35 (split plane): 0.353,58.947 0.288,58.894 0.406,59.012
GND on GND_35 (split plane): 0.461,59.109 0.421,59.035 0.485,59.189
GND on GND_35 (split plane): 0.506,60.498 0.5,60.438 0.5,60.499 0.524,60.557
GND on GND_35 (split plane): 0.581,60.68 0.552,60.626 0.576,60.683 0.62,60.727
GND on GND_35 (split plane): 0.72,60.819 0.673,60.78 0.717,60.824 0.774,60.848
GND on GND_35 (split plane): 0.902,60.894 0.843,60.876 0.901,60.9 0.962,60.9
GND on GND_35 (split plane): 10.991,60.939 10.911,60.915 11.065,60.979
GND on GND_35 (split plane): 11.153,61.047 11.088,60.994 11.206,61.112
GND on GND_35 (split plane): 11.261,61.209 11.221,61.135 11.285,61.289
GND on GND_35 (split plane): 16.181,-5.28 16.22,-5.327 16.176,-5.283 16.152,-5.226
GND on GND_35 (split plane): 16.32,-5.419 16.374,-5.448 16.317,-5.424 16.273,-5.38
GND on GND_35 (split plane): 16.061,-2.509 16.085,-2.589 16.021,-2.435
GND on GND_35 (split plane): 16.106,-5.098 16.124,-5.157 16.1,-5.099 16.1,-5.038
GND on GND_35 (split plane): 16.502,-5.494 16.562,-5.5 16.501,-5.5 16.443,-5.476
GND on GND_35 (split plane): 72.599,-5.5 72.538,-5.5 72.598,-5.494 72.657,-5.476
GND on GND_35 (split plane): 72.783,-5.424 72.726,-5.448 72.78,-5.419 72.827,-5.38
GND on GND_35 (split plane): 72.924,-5.283 72.88,-5.327 72.919,-5.28 72.948,-5.226
GND on GND_35 (split plane): 73,-5.099 72.976,-5.157 72.994,-5.098 73,-5.038
GND on GND_35 (split plane): 11.306,63.098 11.3,63.038 11.3,63.099 11.324,63.157
GND on GND_35 (split plane): 15.791,-2.239 15.865,-2.279 15.711,-2.215
GND on GND_35 (split plane): 11.381,63.28 11.352,63.226 11.376,63.283 11.42,63.327
GND on GND_35 (split plane): 11.52,63.419 11.473,63.38 11.517,63.424 11.574,63.448
GND on GND_35 (split plane): 11.702,63.494 11.643,63.476 11.701,63.5 11.762,63.5
GND on GND_35 (split plane): 15.953,-2.347 16.006,-2.412 15.888,-2.294
GND on GND_35 (split plane): 73,63.099 73,63.038 72.994,63.098 72.976,63.157
GND on GND_35 (split plane): 72.657,63.476 72.598,63.494 72.538,63.5 72.599,63.5
GND on GND_35 (split plane): 72.924,63.283 72.948,63.226 72.919,63.28 72.88,63.327
GND on GND_35 (split plane): 72.783,63.424 72.827,63.38 72.78,63.419 72.726,63.448
GND on GND_57 (split plane): -5.794,-1.798 -5.776,-1.857 -5.8,-1.799 -5.8,-1.738
GND on GND_57 (split plane): -5.719,-1.98 -5.68,-2.027 -5.724,-1.983 -5.748,-1.926
GND on GND_57 (split plane): -5.794,58.398 -5.8,58.338 -5.8,58.399 -5.776,58.457
GND on GND_57 (split plane): -5.719,58.58 -5.748,58.526 -5.724,58.583 -5.68,58.627
GND on GND_57 (split plane): -5.58,-2.119 -5.526,-2.148 -5.583,-2.124 -5.627,-2.08
GND on GND_57 (split plane): -5.398,-2.194 -5.338,-2.2 -5.399,-2.2 -5.457,-2.176
GND on GND_57 (split plane): 143 vertices, not listed, extent -5.799,-5.499 72.999,63.499
GND on GND_57 (split plane): -5.58,58.719 -5.627,58.68 -5.583,58.724 -5.526,58.748
GND on GND_57 (split plane): -5.338,58.8 -5.398,58.794 -5.457,58.776 -5.399,58.8
GND on GND_57 (split plane): 0.191,58.839 0.111,58.815 0.265,58.879
GND on GND_57 (split plane): 0.353,58.947 0.288,58.894 0.406,59.012
GND on GND_57 (split plane): 0.461,59.109 0.421,59.035 0.485,59.189
GND on GND_57 (split plane): 0.506,60.498 0.5,60.438 0.5,60.499 0.524,60.557
GND on GND_57 (split plane): 0.581,60.68 0.552,60.626 0.576,60.683 0.62,60.727
GND on GND_57 (split plane): 0.72,60.819 0.673,60.78 0.717,60.824 0.774,60.848
GND on GND_57 (split plane): 0.902,60.894 0.843,60.876 0.901,60.9 0.962,60.9
GND on GND_57 (split plane): 10.991,60.939 10.911,60.915 11.065,60.979
GND on GND_57 (split plane): 11.153,61.047 11.088,60.994 11.206,61.112
GND on GND_57 (split plane): 11.261,61.209 11.221,61.135 11.285,61.289
GND on GND_57 (split plane): 16.181,-5.28 16.22,-5.327 16.176,-5.283 16.152,-5.226
GND on GND_57 (split plane): 16.32,-5.419 16.374,-5.448 16.317,-5.424 16.273,-5.38
GND on GND_57 (split plane): 16.061,-2.509 16.085,-2.589 16.021,-2.435
GND on GND_57 (split plane): 16.106,-5.098 16.124,-5.157 16.1,-5.099 16.1,-5.038
GND on GND_57 (split plane): 16.502,-5.494 16.562,-5.5 16.501,-5.5 16.443,-5.476
GND on GND_57 (split plane): 72.599,-5.5 72.538,-5.5 72.598,-5.494 72.657,-5.476
GND on GND_57 (split plane): 72.783,-5.424 72.726,-5.448 72.78,-5.419 72.827,-5.38
GND on GND_57 (split plane): 72.924,-5.283 72.88,-5.327 72.919,-5.28 72.948,-5.226
GND on GND_57 (split plane): 73,-5.099 72.976,-5.157 72.994,-5.098 73,-5.038
GND on GND_57 (split plane): 11.306,63.098 11.3,63.038 11.3,63.099 11.324,63.157
GND on GND_57 (split plane): 15.791,-2.239 15.865,-2.279 15.711,-2.215
GND on GND_57 (split plane): 11.381,63.28 11.352,63.226 11.376,63.283 11.42,63.327
GND on GND_57 (split plane): 11.52,63.419 11.473,63.38 11.517,63.424 11.574,63.448
GND on GND_57 (split plane): 11.702,63.494 11.643,63.476 11.701,63.5 11.762,63.5
GND on GND_57 (split plane): 15.953,-2.347 16.006,-2.412 15.888,-2.294
GND on GND_57 (split plane): 73,63.099 73,63.038 72.994,63.098 72.976,63.157
GND on GND_57 (split plane): 72.657,63.476 72.598,63.494 72.538,63.5 72.599,63.5
GND on GND_57 (split plane): 72.924,63.283 72.948,63.226 72.919,63.28 72.88,63.327
GND on GND_57 (split plane): 72.783,63.424 72.827,63.38 72.78,63.419 72.726,63.448
P3V6 on POWER (split plane): 127 vertices, not listed, extent -5.545,-5.245 24.652,60.647
P3V3 on POWER (split plane): 78 vertices, not listed, extent 4.866,-2.532 68.883,35.551
1V8 on POWER (split plane): 215 vertices, not listed, extent -1.829,2.422 72.745,63.245
P2V05 on POWER (split plane): 7.271,35.64 7.271,26.681 1.275,26.681 1.275,34.928 1.278,34.961 1.264,35.009 1.241,35.039 1.237,35.045 1.235,35.046 1.233,35.049 -1.829,37.632 -1.829,43.881 1.496,43.881
3V3APLL on POWER (split plane): 33 vertices, not listed, extent 2.741,41.397 22.09,51.03
VccR0 on POWER (split plane): 30.022,32.244 19.775,32.244 19.768,34.052 30.022,34.052
3V3CDR on POWER (split plane): 49 vertices, not listed, extent 9.667,6.408 50.871,63.245
VADJ on POWER (split plane): 19 vertices, not listed, extent 33.754,-2.532 65.966,6.036
1VPSF on POWER (split plane): 20 vertices, not listed, extent 36.119,2.422 43.08,10.882
P12V on POWER (split plane): 39 vertices, not listed, extent 21.364,-5.245 72.745,11.007
P3V3A on POWER (split plane): 68.248,13.279 65.967,13.279 65.967,15.561 68.248,15.561
VccR1 on POWER (split plane): 30.022,17.994 19.775,17.994 19.775,19.802 30.022,19.802
VccT0 on POWER (split plane): 30.022,30.178 19.775,30.178 19.775,31.986 30.022,31.986
VccT1 on POWER (split plane): 30.022,15.928 19.775,15.928 19.775,17.736 30.022,17.736
VREFAC on POWER (split plane): 72 vertices, not listed, extent 51.13,14.245 54.006,49.967
GND on GND_810 (split plane): -5.794,-1.798 -5.776,-1.857 -5.8,-1.799 -5.8,-1.738
GND on GND_810 (split plane): -5.719,-1.98 -5.68,-2.027 -5.724,-1.983 -5.748,-1.926
GND on GND_810 (split plane): -5.794,58.398 -5.8,58.338 -5.8,58.399 -5.776,58.457
GND on GND_810 (split plane): -5.719,58.58 -5.748,58.526 -5.724,58.583 -5.68,58.627
GND on GND_810 (split plane): -5.58,-2.119 -5.526,-2.148 -5.583,-2.124 -5.627,-2.08
GND on GND_810 (split plane): -5.398,-2.194 -5.338,-2.2 -5.399,-2.2 -5.457,-2.176
GND on GND_810 (split plane): 143 vertices, not listed, extent -5.799,-5.499 72.999,63.499
GND on GND_810 (split plane): -5.58,58.719 -5.627,58.68 -5.583,58.724 -5.526,58.748